# Altium PCB SBC_PCB.PcbDoc (part 3 of 4)
Units mm, origin at the board's own origin, x right, y up, seen from the top; angles counter-clockwise.
Board outline 85 x 56 mm, 8 copper layers (L1(SIG), L2(GND), L3(PWR), L4(SIG), L5(GND), L6(SIG), L7(GND), L8(SIG)), stack 1.593 mm thick; 597 components, 497 nets, 2394 pads, 229 vias.
Unrouted connection lines stored in the file: 1459.
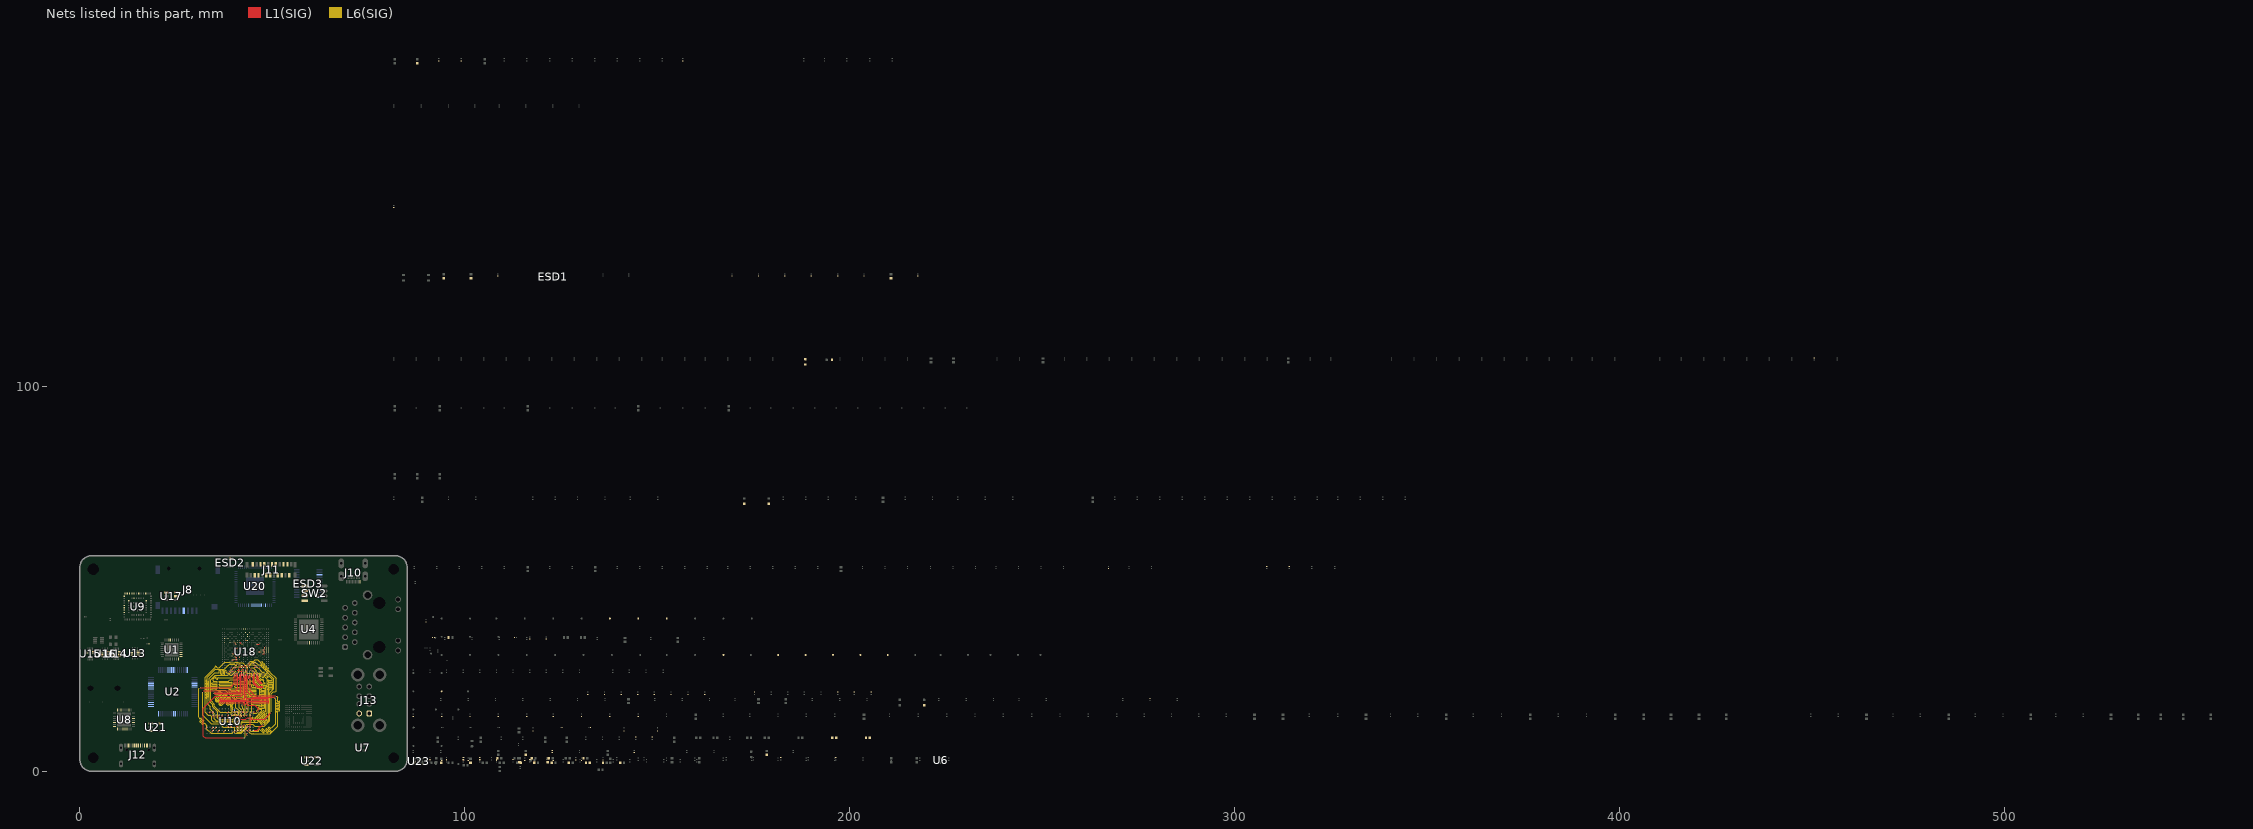
[diagram p4: the nets of this part, all layers, seen from the top]

## Via types
v1: diameter 0.35, hole 0.2, L1(SIG) to L8(SIG), 222 vias
v2: diameter 0.45, hole 0.2, L1(SIG) to L8(SIG), 7 vias

## Nets (pads, with @x,y where several pads share a name; then routed paths per layer and width w, separated by ;. In a path a pad name is that pad's centre, name@x,y a point inside that pad or via, vN(x,y) a via of type N, cw(c..) or ccw(c..) an arc to the next point about the centre after c; other vN are vias at no path point) (continued)
+3V3_PMIC: C72.1 C73.1 C75.1 C224.1 C225.1 C226.1 C227.1 C228.1 R72.2 R78.1 R79.1 R81.1 TP17.TP TP19.TP U8.6 U8.22 U18.F11 U18.G12 U18.H9 U18.K10 U18.Y13 | length 1.7
  L1(SIG) w0.076: v1(39.548,30.48) 39.558,30.49 39.99,30.49 U18.G12@40,30.5 ; U18.H9@40.5,29 40.533,28.967 40.858,28.967 v1(40.894,28.931) ; U18.K10@41.5,29.5 41.515,29.515 41.515,29.881 v1(41.529,29.896) ; U18.Y13@46.5,31 46.506,30.994 46.933,30.994 v1(46.939,30.988)
+3V3_uSD: C143.1 R129.1 R137.1 U17.1
+3V3_WB: C83.1 C84.1 C85.1 U9.3 U9.49
+5V_CONN: C258.1 J10.19
+5V_DVBUS1: C261.1 ESD5.1 J13.1 R182.1 U21.1
+5V_DVBUS2: C263.1 ESD8.1 J13.5 R189.1 U22.1
+5V_HDMI: C257.1 ESD3.15
+5V_SYS: C80.1 C267.1 R63.2 R65.2 R80.1 R183.1 R191.1 R213.1 TP13.TP U6.3 U7.3 U8.4 U8.5 U8.13 U8.26 U8.30 U21.5 U22.5 U23.5
+5V_VBUS: C259.1 C266.1 ESD4.1 J12.A4 J12.A9 J12.B4 J12.B9 R212.1 U18.H10 U23.3 | length 0.4
  L1(SIG) w0.076: U18.H10@40.5,29.5 40.533,29.533 40.729,29.533 40.812,29.616 v1(40.886,29.616)
+VDD_uSD: C141.1 C142.1 C144.1 C222.1 C223.1 ESD1.5 ESD2.5 J8.4 R74.2 R130.1 R131.1 R132.1 R133.1 R134.1 U17.5 U17.6 U18.J18
+VIO_HDMI: ESD3.24 R181.1
\DDR4_ACT: U10.L3 U18.N6 | length 33.9
  L1(SIG) w0.076: v1(42.951,27.051) 42.976,27.075 42.976,27.476 U18.N6@43,27.5
  L1(SIG) w0.12: v1(40.411,12.065) 40.411,12.027 41,11.438 U10.L3@41,11.4
  L6(SIG) w0.11: v1(40.411,12.065) 40.134,12.342 40.134,12.571 39.903,12.802 34.595,12.802 34.214,13.183 34.214,14.199 33.833,14.58 33.274,14.58 32.588,15.265 32.588,24.46 35.052,26.924 35.107,26.924 ccw(c35.107,27.034) 35.217,27.034 35.217,27.21 cw(c35.289,27.21) 35.289,27.282 35.505,27.282 cw(c35.505,27.21) 35.577,27.21 35.577,27.034 ccw(c35.687,27.034) 35.687,26.924 36.031,26.924 36.144,26.924 37.592,28.372 38.862,28.372 39.014,28.22 40.199,28.22 40.339,28.359 41.125,28.359 41.331,28.153 42.239,28.153 42.951,27.441 v1(42.951,27.051)
\DDR4_ALERT: R99.2 U10.P9 U18.R3 | length 0.6
  L1(SIG) w0.076: U10.P9@43.396,16.196 U10.P9@43.4,16.2 43.4,16.756 v1(43.404,16.76)
\DDR4_CAS: U10.M8 U18.M4 | length 33.9
  L1(SIG) w0.076: v1(42.13,26.622) 42.204,26.622 42.292,26.533 42.467,26.533 U18.M4@42.5,26.5
  L1(SIG) w0.12: U10.M8@41.8,15.4 41.808,15.4 42.156,15.748 v1(42.164,15.748)
  L6(SIG) w0.11: v1(42.13,26.622) 42.13,26.239 42.062,26.171 42.062,25.121 40.915,23.973 40.691,23.749 39.014,23.749 39.01,23.745 38.714,23.449 cw(c38.636,23.527) 38.636,23.417 36.246,23.417 ccw(c36.246,23.345) 36.174,23.345 36.174,23.129 ccw(c36.246,23.129) 36.246,23.057 39.491,23.057 cw(c39.491,22.985) 39.563,22.985 39.563,22.769 cw(c39.491,22.769) 39.491,22.697 36.246,22.697 ccw(c36.246,22.625) 36.174,22.625 36.174,22.409 ccw(c36.246,22.409) 36.246,22.337 39.491,22.337 cw(c39.491,22.265) 39.563,22.265 39.563,22.049 cw(c39.491,22.049) 39.491,21.977 36.246,21.977 ccw(c36.246,21.905) 36.174,21.905 36.174,21.689 ccw(c36.246,21.689) 36.246,21.617 38.632,21.617 cw(c38.632,21.494) 38.719,21.581 38.774,21.526 38.774,20.51 41.427,17.856 41.427,16.485 v1(42.164,15.748)
\DDR4_CS: U10.L7 U18.L6 | length 34.1
  L1(SIG) w0.076: v1(41.574,27.607) 41.648,27.607 41.755,27.5 U18.L6@42,27.5
  L1(SIG) w0.12: v1(40.284,13.462) 40.31,13.488 40.31,13.877 41,14.567 U10.L7@41,14.6
  L6(SIG) w0.11: v1(40.284,13.462) 39.954,13.132 35.408,13.132 34.95,13.589 34.95,14.961 33.858,16.053 33.858,16.713 33.045,17.526 33.045,18.772 33.045,18.827 ccw(c32.935,18.827) 32.935,18.937 32.92,18.937 cw(c32.92,19.009) 32.848,19.009 32.848,19.225 cw(c32.92,19.225) 32.92,19.297 33.221,19.297 ccw(c33.221,19.369) 33.293,19.369 33.293,19.585 ccw(c33.221,19.585) 33.221,19.657 32.92,19.657 cw(c32.92,19.729) 32.848,19.729 32.848,19.945 cw(c32.92,19.945) 32.92,20.017 33.221,20.017 ccw(c33.221,20.089) 33.293,20.089 33.293,20.305 ccw(c33.221,20.305) 33.221,20.377 32.92,20.377 cw(c32.92,20.449) 32.848,20.449 32.848,20.665 cw(c32.92,20.665) 32.92,20.737 33.221,20.737 ccw(c33.221,20.809) 33.293,20.809 33.293,21.025 ccw(c33.221,21.025) 33.221,21.097 32.92,21.097 cw(c32.92,21.169) 32.848,21.169 32.848,21.385 cw(c32.92,21.385) 32.92,21.457 33.221,21.457 ccw(c33.221,21.529) 33.293,21.529 33.293,21.745 ccw(c33.221,21.745) 33.221,21.817 32.92,21.817 cw(c32.92,21.889) 32.848,21.889 32.848,22.105 cw(c32.92,22.105) 32.92,22.177 33.221,22.177 ccw(c33.221,22.249) 33.293,22.249 33.293,22.465 ccw(c33.221,22.465) 33.221,22.537 32.92,22.537 cw(c32.92,22.609) 32.848,22.609 32.848,22.825 cw(c32.92,22.825) 32.92,22.897 33.221,22.897 ccw(c33.221,22.969) 33.293,22.969 33.293,23.185 ccw(c33.221,23.185) 33.221,23.257 32.92,23.257 cw(c32.92,23.329) 32.848,23.329 32.848,23.545 cw(c32.92,23.545) 32.92,23.617 32.935,23.617 ccw(c32.935,23.727) 33.045,23.727 33.045,23.901 33.045,24.359 35.204,26.518 37.506,26.518 38.573,27.585 38.643,27.585 38.846,27.787 40.142,27.787 40.23,27.699 40.641,27.699 40.806,27.864 41.317,27.864 v1(41.574,27.607)
\DDR4_LDM: U10.E7 U18.W5 | length 1.2
  L1(SIG) w0.076: v1(36.183,13.945) 36.191,13.953 36.191,14.591 U10.E7@36.2,14.6 ; U18.W5@46,27 46.026,27.026 v1(46.558,27.026)
\DDR4_RAS: U10.L8 U18.M5 | length 33.8
  L1(SIG) w0.076: v1(42.469,27.457) 42.484,27.442 42.484,27.016 U18.M5@42.5,27
  L1(SIG) w0.12: v1(40.716,15.037) 40.716,15.077 41,15.36 U10.L8@41,15.4
  L6(SIG) w0.11: v1(40.716,15.037) 40.716,14.402 39.802,13.487 36.068,13.487 35.789,13.767 35.789,15.494 34.525,16.758 34.525,17.253 33.553,18.224 33.553,24.155 35.001,25.603 36.079,25.603 36.134,25.603 ccw(c36.134,25.713) 36.244,25.713 36.244,26.186 cw(c36.316,26.186) 36.316,26.258 36.532,26.258 cw(c36.532,26.186) 36.604,26.186 36.604,25.3 ccw(c36.676,25.3) 36.676,25.228 36.892,25.228 ccw(c36.892,25.3) 36.964,25.3 36.964,26.186 cw(c37.036,26.186) 37.036,26.258 37.252,26.258 cw(c37.252,26.186) 37.324,26.186 37.324,25.3 ccw(c37.396,25.3) 37.396,25.228 37.612,25.228 ccw(c37.612,25.3) 37.684,25.3 37.684,26.141 cw(c37.756,26.141) 37.756,26.213 37.972,26.213 cw(c37.972,26.141) 38.044,26.141 38.044,25.713 ccw(c38.154,25.713) 38.154,25.603 38.983,25.603 39.116,25.603 39.37,25.857 39.37,26.266 40.282,27.178 41.801,27.178 42.081,27.457 v1(42.469,27.457)
\DDR4_RESET: R100.2 R103.1 U10.P1 U18.G1 | length 0.5
  L1(SIG) w0.076: U10.P1@43.4,9.8 43.404,9.796 43.404,9.301 v1(43.409,9.296)
\DDR4_UDM: U10.E2 U18.H5 | length 1.1
  L1(SIG) w0.076: v1(40.144,26.573) 40.144,26.608 40.467,26.931 40.467,26.967 U18.H5@40.5,27
  L1(SIG) w0.12: v1(35.815,10.213) v1(35.815,10.213) U10.E2@36.2,10.6 U10.E2@36.2,10.602
\DDR4_WE: U10.L2 U18.N3 | length 33.9
  L1(SIG) w0.076: U18.N3@43,26 43.005,26.005 43.48,26.005 v1(43.485,26.01)
  L1(SIG) w0.12: v1(40.665,10.236) 40.665,10.251 41,10.585 U10.L2@41,10.6
  L6(SIG) w0.11: v1(40.665,10.236) 40.697,10.236 40.85,10.084 41.834,10.084 43.078,11.328 43.078,11.913 43.358,12.192 44.882,12.192 45.365,11.709 47.93,11.709 49.378,13.157 49.378,20.422 50.368,21.412 50.368,24.054 46.752,27.67 46.653,27.67 46.644,27.661 46.371,27.661 46.361,27.67 46.279,27.67 45.603,28.346 44.753,28.346 44.136,27.729 43.476,27.729 43.283,27.536 43.283,26.906 43.485,26.704 v1(43.485,26.01)
\DFP_USB1_FLG: R183.2 U21.3
\DFP_USB2_FLG: R191.2 U22.3
\EMMC_RESET: D3.1
\ETH_PHY_RST: D2.1
\HDMI_INT: R166.2 TP51.TP U20.52
\HDMI_RST: D7.1
\PMIC_INT: R78.2 U8.11
\PMIC_RSTOUT: R79.2 U8.18
\RESET: D3.2 D4.2 R117.2 TP6.TP U11.K5
\RESET: D1.2 D2.2 R26.2 U4.43
\RESETSTATz: D4.1
ADCOUT: R3.2 U1.9
AUXOUT1: C1.1 U1.21
AUXOUT1_CON: C1.2 R10.2
AUXOUT2: C2.1 U1.22
AUXOUT2_CON: C2.2 R9.2
BCLK: R1.2 U1.8
BOOTMODE00: R201.2 R211.1 U18.M25
BOOTMODE01: R202.2 R210.1 U18.N23
BOOTMODE02: R203.2 R209.1 U18.N24
BOOTMODE03: R208.1 SW2.4 U18.N25
BOOTMODE04: R207.1 SW2.3 U18.P24
BOOTMODE05: R206.1 SW2.2 U18.P22
BOOTMODE06: R205.1 SW2.1 U18.P21
BOOTMODE07: R196.2 R204.1 U18.R23
BT_DEV_WAKE: U9.51
BT_GPIO_2: TP34.TP U9.18
BT_GPIO_3: TP35.TP U9.19
BT_GPIO_5: TP36.TP U9.20
BT_HOST_WAKE: U9.17
BT_PCM_CLK: R89.1 U18.B20
BT_PCM_IN: U9.6 U18.E18
BT_PCM_OUT: U9.9 U18.B18
BT_PCM_SYNC: U9.8 U18.D20
BT_REG_EN: U9.68
BT_UART_CTS_N: U9.11
BT_UART_RTS_N: U9.13
BT_UART_RXD: U9.12
BT_UART_TXD: U9.10
BUCK1_VOUT: C67.1 R71.1 TP14.TP U8.1
BUCK2_VOUT: C69.1 R72.1 TP15.TP U8.32
BUCK3_VOUT: C71.1 R73.1 TP16.TP U8.24
CAM_I2C_SCL: J11.20
CAM_I2C_SDA: J11.21
CAM_IO0: J11.17
CAM_IO1: J11.18
CAP_VDDS0: C229.1 U18.H15 | length 0.5
  L1(SIG) w0.076: U18.H15@40.5,32 40.515,32.015 40.93,32.015 v1(40.945,32.029)
CAP_VDDS1: C230.1 U18.K18 | length 0.7
  L1(SIG) w0.076: U18.K18@41.5,33.5 41.547,33.5 41.995,33.052 v1(42.044,33.052)
CAP_VDDS2: C231.1 U18.W17 | length 0.7
  L1(SIG) w0.076: U18.W17@46,33 46.033,33.033 46.632,33.033 v1(46.691,33.093)
CAP_VDDS3: C232.1 U18.P19 | length 0.4
  L1(SIG) w0.076: v1(43.104,34.061) 43.135,34.031 43.469,34.031 U18.P19@43.5,34
CAP_VDDS4: C233.1 U18.U7 | length 0.5
  L1(SIG) w0.076: U18.U7@45,28 45.008,28.008 45.458,28.008 v1(45.466,28.016)
CAP_VDDS5: C234.1 U18.H17 | length 0.7
  L1(SIG) w0.076: v1(40.03,33.477) 40.03,33.473 40.5,33.004 U18.H17@40.5,33
CAP_VDDS6: C235.1 U18.J19
CAP_VDDS_CANUART: C236.1 U18.G9 | length 0.5
  L1(SIG) w0.076: v1(39.55,28.897) 39.624,28.897 39.727,29 U18.G9@40,29
CAP_VDDS_MCU: C237.1 U18.H11 | length 0.4
  L1(SIG) w0.076: v1(40.097,30.011) 40.103,30.005 40.495,30.005 U18.H11@40.5,30
CLK_OUT0: 
CLK_OUT1: 
CLK_OUT2: 
CLK_OUT3: 
CODEC_CLK: U1.11
CSI0_RXRCALIB: R146.1 U18.AA14
CSI_CLK_N: J11.8 U18.AD15
CSI_CLK_P: J11.9 U18.AE15
CSI_D0_N: J11.2 U18.AB14 | length 0.5
  L1(SIG) w0.076: U18.AB14@47.5,31.5 47.511,31.511 47.995,31.511 v1(48.006,31.521)
CSI_D0_P: J11.3 U18.AC15 | length 0.4
  L1(SIG) w0.076: U18.AC15@48,32 48.003,32.003 48.003,32.407 v1(48.006,32.41)
CSI_D1_N: J11.5 U18.AD14
CSI_D1_P: J11.6 U18.AE14
CSI_D2_N: J11.11 U18.AD13
CSI_D2_P: J11.12 U18.AE13
CSI_D3_N: J11.14 U18.AB12 | length 0.5
  L1(SIG) w0.076: U18.AB12@47.5,30.5 47.503,30.503 48.003,30.503 v1(48.006,30.505)
CSI_D3_P: J11.15 U18.AC13 | length 0.4
  L1(SIG) w0.076: v1(47.589,31.016) 47.597,31.008 47.992,31.008 U18.AC13@48,31
D16: R169.2 U20.13
D17: R170.2 U20.11
D18: R171.2 U20.10
D19: R172.2 U20.9
D20: R173.2 U20.8
D21: R174.2 U20.7
D22: R175.2 U20.6
D23: R176.2 U20.4
DACIN: R4.2 U1.10
DBG_JTAG_TCK: U13.12
DBG_JTAG_TDI: U13.11
DBG_JTAG_TDO: U13.10
DBG_JTAG_TMS: U13.9
DBG_UART1_CTS: U14.9
DBG_UART1_RTS: U14.10
DBG_UART1_RXD: U14.11
DBG_UART1_TXD: U14.12
DBG_UART2_CTS: U15.9
DBG_UART2_RTS: U15.10
DBG_UART2_RXD: U15.11
DBG_UART2_TXD: U15.12
DBG_UART3_CTS: U16.9
DBG_UART3_RTS: U16.10
DBG_UART3_RXD: U16.11
DBG_UART3_TXD: U16.12
DBG_USB_CC1: J12.A5 R188.1
DBG_USB_CC2: J12.B5 R187.1
DBG_USB_N: ESD6.2 J12.A7 J12.B7 U2.7
DBG_USB_P: ESD7.2 J12.A6 J12.B6 U2.8
DBGT_JTAG_TCK: U2.16
DBGT_JTAG_TDI: U2.17 U13.2
DBGT_JTAG_TDO: U2.18 U13.3
DBGT_JTAG_TMS: U2.19 U13.4
DBGT_UART1_CTS: U2.29 U14.4
DBGT_UART1_RTS: U2.28 U14.3
DBGT_UART1_RXD: U2.27 U14.2
DBGT_UART1_TXD: U2.26
DBGT_UART2_CTS: U2.41 U15.4
DBGT_UART2_RTS: U2.40 U15.3
DBGT_UART2_RXD: U2.39 U15.2
DBGT_UART2_TXD: U2.38
DBGT_UART3_CTS: U2.54 U16.4
DBGT_UART3_RTS: U2.53 U16.3
DBGT_UART3_RXD: U2.52 U16.2
DBGT_UART3_TXD: U2.48
DDR4_A0: U10.P3 U18.J1 | length 35.2
  L1(SIG) w0.076: 41,24.359 U18.J1@41,25
  L1(SIG) w0.12: v1(31.902,20.676) 32.156,20.93 40.386,20.93 41,21.544 41,24.359 ; U10.P3@43.4,11.4 43.4,11.449 43.764,11.813 v1(43.764,11.862)
  L6(SIG) w0.11: v1(31.902,20.676) 31.902,14.554 34.163,12.294 36.347,12.294 37.186,11.455 39.15,11.455 39.175,11.481 40.132,11.481 40.284,11.328 40.284,10.015 40.476,9.824 41.941,9.824 43.338,11.221 43.338,11.436 v1(43.764,11.862)
DDR4_A1: U10.P7 U18.J2 | length 34.4
  L1(SIG) w0.076: 40.636,24.359 40.636,24.753 40.749,24.866 40.749,25.249 U18.J2@41,25.5
  L1(SIG) w0.12: v1(40.615,22.174) 40.636,22.196 40.636,24.359 ; v1(43.015,14.213) v1(43.015,14.213) U10.P7@43.4,14.6 U10.P7@43.4,14.6
  L6(SIG) w0.11: v1(40.615,22.174) 40.335,22.174 40.243,22.082 40.243,21.987 40.243,21.932 ccw(c40.353,21.932) 40.353,21.822 42.111,21.822 cw(c42.111,21.75) 42.183,21.75 42.183,21.534 cw(c42.111,21.534) 42.111,21.462 39.106,21.462 ccw(c39.106,21.39) 39.034,21.39 39.034,21.174 ccw(c39.106,21.174) 39.106,21.102 42.111,21.102 cw(c42.111,21.03) 42.183,21.03 42.183,20.814 cw(c42.111,20.814) 42.111,20.742 39.341,20.742 ccw(c39.341,20.67) 39.269,20.67 39.269,20.454 ccw(c39.341,20.454) 39.341,20.382 42.111,20.382 cw(c42.111,20.31) 42.183,20.31 42.183,20.094 cw(c42.111,20.094) 42.111,20.022 40.061,20.022 ccw(c40.061,19.95) 39.989,19.95 39.989,19.734 ccw(c40.061,19.734) 40.061,19.662 42.111,19.662 cw(c42.111,19.59) 42.183,19.59 42.183,19.374 cw(c42.111,19.374) 42.111,19.302 40.781,19.302 ccw(c40.781,19.23) 40.709,19.23 40.709,19.014 ccw(c40.781,19.014) 40.781,18.942 42.111,18.942 cw(c42.111,18.87) 42.183,18.87 42.183,18.654 cw(c42.111,18.654) 42.111,18.582 41.826,18.582 ccw(c41.826,18.51) 41.754,18.51 41.754,18.294 ccw(c41.826,18.294) 41.826,18.222 42.082,18.222 cw(c42.082,18.112) 42.16,18.19 42.748,17.602 42.934,17.417 42.934,15.365 42.774,15.205 42.774,14.833 43.015,14.593 v1(43.015,14.213)
DDR4_A2: U10.R3 U18.K3 | length 34.4
  L1(SIG) w0.076: U18.K3@41.5,26 41.505,26.005 42.362,26.005 v1(42.393,26.035)
  L1(SIG) w0.12: v1(43.942,13.614) 44.2,13.356 U10.R3@44.2,11.4
  L6(SIG) w0.11: v1(42.393,26.035) 42.697,25.73 42.697,24.359 42.697,24.282 ; 42.698,24.282 ccw(c42.776,24.359) 42.854,24.282 42.88,24.308 cw(c42.931,24.257) 42.982,24.308 43.134,24.155 cw(c43.083,24.104) 43.134,24.053 42.857,23.776 ccw(c42.908,23.725) 42.857,23.674 43.01,23.521 ccw(c43.061,23.572) 43.112,23.521 43.366,23.776 cw(c43.417,23.725) 43.468,23.776 43.621,23.623 cw(c43.57,23.572) 43.621,23.521 43.274,23.174 ccw(c43.324,23.123) 43.274,23.072 43.426,22.919 ccw(c43.477,22.97) 43.528,22.919 44.174,23.565 cw(c44.225,23.514) 44.276,23.565 44.428,23.412 cw(c44.377,23.361) 44.428,23.311 43.869,22.751 ccw(c43.92,22.7) 43.869,22.649 44.022,22.497 ccw(c44.073,22.548) 44.124,22.497 44.226,22.599 cw(c44.303,22.521) 44.381,22.599 44.538,22.442 44.577,22.403 44.577,22.123 44.577,21.935 ccw(c44.687,21.935) 44.687,21.825 45.741,21.825 cw(c45.741,21.753) 45.813,21.753 45.813,21.537 cw(c45.741,21.537) 45.741,21.465 44.095,21.465 ccw(c44.095,21.393) 44.023,21.393 44.023,21.177 ccw(c44.095,21.177) 44.095,21.105 45.751,21.105 cw(c45.751,21.033) 45.823,21.033 45.823,20.817 cw(c45.751,20.817) 45.751,20.745 44.095,20.745 ccw(c44.095,20.673) 44.023,20.673 44.023,20.457 ccw(c44.095,20.457) 44.095,20.385 45.751,20.385 cw(c45.751,20.313) 45.823,20.313 45.823,20.097 cw(c45.751,20.097) 45.751,20.025 44.095,20.025 ccw(c44.095,19.953) 44.023,19.953 44.023,19.737 ccw(c44.095,19.737) 44.095,19.665 45.751,19.665 cw(c45.751,19.593) 45.823,19.593 45.823,19.377 cw(c45.751,19.377) 45.751,19.305 44.095,19.305 ccw(c44.095,19.233) 44.023,19.233 44.023,19.017 ccw(c44.095,19.017) 44.095,18.945 44.467,18.945 cw(c44.467,18.835) 44.577,18.835 44.577,18.78 44.577,15.545 44.257,15.225 44.257,13.929 v1(43.942,13.614)
DDR4_A3: U10.N7 U18.L5 | length 34
  L1(SIG) w0.076: v1(41.199,26.848) 41.273,26.848 41.425,27 U18.L5@42,27
  L1(SIG) w0.12: v1(42.215,14.213) v1(42.215,14.213) U10.N7@42.6,14.6 U10.N7@42.6,14.6
  L6(SIG) w0.11: v1(41.199,26.848) 41.199,25.705 39.776,24.282 36.703,24.282 35.945,24.282 ccw(c35.945,24.172) 35.835,24.172 35.835,24.034 cw(c35.763,24.034) 35.763,23.962 35.547,23.962 cw(c35.547,24.034) 35.475,24.034 35.475,24.49 ccw(c35.403,24.49) 35.403,24.562 35.187,24.562 ccw(c35.187,24.49) 35.115,24.49 35.115,24.392 cw(c35.005,24.392) 35.005,24.282 34.95,24.282 34.696,24.028 34.696,23.749 34.696,23.462 ccw(c34.806,23.462) 34.806,23.352 35.656,23.352 cw(c35.656,23.28) 35.728,23.28 35.728,23.064 cw(c35.656,23.064) 35.656,22.992 34.292,22.992 ccw(c34.292,22.92) 34.22,22.92 34.22,22.704 ccw(c34.292,22.704) 34.292,22.632 35.656,22.632 cw(c35.656,22.56) 35.728,22.56 35.728,22.344 cw(c35.656,22.344) 35.656,22.272 34.292,22.272 ccw(c34.292,22.2) 34.22,22.2 34.22,21.984 ccw(c34.292,21.984) 34.292,21.912 35.656,21.912 cw(c35.656,21.84) 35.728,21.84 35.728,21.624 cw(c35.656,21.624) 35.656,21.552 34.292,21.552 ccw(c34.292,21.48) 34.22,21.48 34.22,21.264 ccw(c34.292,21.264) 34.292,21.192 35.348,21.192 cw(c35.348,21.069) 35.435,21.156 35.49,21.101 35.509,21.082 37.77,21.082 40.528,18.324 40.528,18.021 40.528,16.525 41.101,15.951 41.123,15.951 41.656,15.418 41.656,14.772 v1(42.215,14.213)
DDR4_A4: U10.N3 U18.K4 | length 33.8
  L1(SIG) w0.076: v1(40.688,26.25) 41.25,26.25 U18.K4@41.5,26.5
  L1(SIG) w0.12: U10.N3@42.6,11.4 42.623,11.423 42.623,12.067 v1(42.647,12.09)
  L6(SIG) w0.11: v1(40.688,26.25) 40.688,26.226 39.937,25.475 39.43,24.968 38.997,24.968 cw(c38.997,25.078) 38.887,25.078 38.887,25.271 ccw(c38.815,25.271) 38.815,25.343 38.599,25.343 ccw(c38.599,25.271) 38.527,25.271 38.527,25.078 cw(c38.417,25.078) 38.417,24.968 38.362,24.968 35.154,24.968 33.96,23.774 33.96,18.415 34.95,17.424 34.95,16.891 36.474,15.367 39.167,15.367 39.37,15.164 39.37,14.732 39.599,14.503 40.245,14.503 40.31,14.568 40.31,15.392 40.564,15.646 40.945,15.646 41.224,15.367 41.224,14.554 41.642,14.136 41.642,13.601 40.894,12.852 40.894,10.897 41.3,10.49 41.707,10.49 42.215,10.998 42.215,11.636 42.647,12.068 v1(42.647,12.09)
DDR4_A5: U10.P8 U18.K1 | length 34.3
  L1(SIG) w0.076: 41.45,24.359 41.5,24.409 U18.K1@41.5,25
  L1(SIG) w0.12: v1(41.335,23.571) 41.335,24.244 41.45,24.359 ; v1(43.104,15.011) 43.104,15.058 43.4,15.354 U10.P8@43.4,15.4
  L6(SIG) w0.11: v1(41.335,23.571) 41.487,23.42 41.542,23.365 ; 41.543,23.364 ccw(c41.629,23.451) 41.629,23.329 42.805,23.329 cw(c42.805,23.257) 42.877,23.257 42.877,23.041 cw(c42.805,23.041) 42.805,22.969 39.975,22.969 ccw(c39.975,22.897) 39.903,22.897 39.903,22.681 ccw(c39.975,22.681) 39.975,22.609 43.525,22.609 cw(c43.525,22.537) 43.597,22.537 43.597,22.321 cw(c43.525,22.321) 43.525,22.249 42.485,22.249 ccw(c42.485,22.177) 42.413,22.177 42.413,21.961 ccw(c42.485,21.961) 42.485,21.889 43.691,21.889 cw(c43.691,21.817) 43.763,21.817 43.763,21.601 cw(c43.691,21.601) 43.691,21.529 42.515,21.529 ccw(c42.515,21.457) 42.443,21.457 42.443,21.241 ccw(c42.515,21.241) 42.515,21.169 43.691,21.169 cw(c43.691,21.097) 43.763,21.097 43.763,20.881 cw(c43.691,20.881) 43.691,20.809 42.515,20.809 ccw(c42.515,20.737) 42.443,20.737 42.443,20.521 ccw(c42.515,20.521) 42.515,20.449 43.691,20.449 cw(c43.691,20.377) 43.763,20.377 43.763,20.161 cw(c43.691,20.161) 43.691,20.089 42.515,20.089 ccw(c42.515,20.017) 42.443,20.017 42.443,19.801 ccw(c42.515,19.801) 42.515,19.729 43.691,19.729 cw(c43.691,19.657) 43.763,19.657 43.763,19.441 cw(c43.691,19.441) 43.691,19.369 42.515,19.369 ccw(c42.515,19.297) 42.443,19.297 42.443,19.081 ccw(c42.515,19.081) 42.515,19.009 43.691,19.009 cw(c43.691,18.937) 43.763,18.937 43.763,18.721 cw(c43.691,18.721) 43.691,18.649 42.515,18.649 ccw(c42.515,18.577) 42.443,18.577 42.443,18.361 ccw(c42.515,18.361) 42.515,18.289 43.601,18.289 cw(c43.601,18.217) 43.673,18.217 43.673,18.001 cw(c43.601,18.001) 43.601,17.929 43.322,17.929 ccw(c43.322,17.819) 43.245,17.741 43.739,17.247 43.739,16.51 43.739,15.596 43.155,15.011 v1(43.104,15.011)
DDR4_A6: U10.P2 U18.R2 | length 35.2
  L1(SIG) w0.076: U18.R2@44,25.5 44.249,25.251 44.249,24.359
  L1(SIG) w0.12: U10.P2@43.4,10.6 43.426,10.6 43.789,10.236 v1(43.815,10.236) ; 44.249,24.359 44.249,20.877 45.466,19.66 51.029,19.66 v1(51.054,19.634)
  L6(SIG) w0.11: v1(43.815,10.236) 43.861,10.19 43.969,10.19 44.482,9.677 49.479,9.677 51.435,11.633 51.435,15.162 51.435,15.217 ccw(c51.325,15.217) 51.325,15.327 51.183,15.327 cw(c51.183,15.399) 51.111,15.399 51.111,15.615 cw(c51.183,15.615) 51.183,15.687 51.79,15.687 ccw(c51.79,15.759) 51.862,15.759 51.862,15.975 ccw(c51.79,15.975) 51.79,16.047 51.183,16.047 cw(c51.183,16.119) 51.111,16.119 51.111,16.335 cw(c51.183,16.335) 51.183,16.407 51.79,16.407 ccw(c51.79,16.479) 51.862,16.479 51.862,16.695 ccw(c51.79,16.695) 51.79,16.767 51.183,16.767 cw(c51.183,16.839) 51.111,16.839 51.111,17.055 cw(c51.183,17.055) 51.183,17.127 51.79,17.127 ccw(c51.79,17.199) 51.862,17.199 51.862,17.415 ccw(c51.79,17.415) 51.79,17.487 51.183,17.487 cw(c51.183,17.559) 51.111,17.559 51.111,17.775 cw(c51.183,17.775) 51.183,17.847 51.79,17.847 ccw(c51.79,17.919) 51.862,17.919 51.862,18.135 ccw(c51.79,18.135) 51.79,18.207 51.299,18.207 cw(c51.299,18.279) 51.227,18.279 51.227,18.495 cw(c51.299,18.495) 51.299,18.567 51.325,18.567 ccw(c51.325,18.677) 51.435,18.677 51.435,18.923 51.435,19.253 v1(51.054,19.634)
DDR4_A7: U10.R8 U18.P2 | length 37.6
  L1(SIG) w0.076: 43.23,24.359 43.249,24.378 43.249,25.249 U18.P2@43.5,25.5
  L1(SIG) w0.12: 43.23,24.359 43.23,19.507 43.23,19.03 ccw(c43.35,19.03) 43.35,18.91 48.87,18.91 cw(c48.87,18.836) 48.944,18.836 48.944,18.614 cw(c48.87,18.614) 48.87,18.54 43.304,18.54 ccw(c43.304,18.466) 43.23,18.466 43.23,18.244 ccw(c43.304,18.244) 43.304,18.17 48.942,18.17 cw(c48.942,18.096) 49.016,18.096 49.016,17.874 cw(c48.942,17.874) 48.942,17.8 43.35,17.8 ccw(c43.35,17.68) 43.23,17.68 43.23,17.578 43.475,17.333 43.663,17.145 45.39,17.145 46.304,16.231 v1(46.304,15.443) ; U10.R8@44.2,15.4 44.245,15.4 44.608,15.037 v1(44.653,15.037)
  L6(SIG) w0.11: v1(44.653,15.037) 45.898,15.037 v1(46.304,15.443)
DDR4_A8: U10.R2 U18.P1 | length 35.1
  L1(SIG) w0.076: 43.5,24.359 U18.P1@43.5,25
  L1(SIG) w0.12: 43.5,24.359 43.5,20.711 44.933,19.279 50.394,19.279 v1(50.673,18.999) ; v1(43.811,10.985) v1(43.811,10.985) 44.198,10.6 U10.R2@44.2,10.6
  L6(SIG) w0.11: v1(43.811,10.985) 44.357,10.439 46.239,10.439 46.362,10.439 ccw(c46.362,10.549) 46.44,10.627 46.253,10.814 cw(c46.304,10.865) 46.253,10.916 46.406,11.068 cw(c46.457,11.017) 46.508,11.068 47.588,9.988 ccw(c47.639,10.039) 47.69,9.988 47.843,10.141 ccw(c47.792,10.192) 47.843,10.243 47.272,10.814 cw(c47.323,10.865) 47.272,10.916 47.424,11.068 cw(c47.475,11.017) 47.526,11.068 48.606,9.988 ccw(c48.657,10.039) 48.708,9.988 48.861,10.141 ccw(c48.81,10.192) 48.861,10.243 48.29,10.814 cw(c48.341,10.865) 48.29,10.916 48.443,11.068 cw(c48.494,11.017) 48.544,11.068 49.473,10.14 ccw(c49.523,10.191) 49.574,10.14 49.727,10.293 ccw(c49.676,10.344) 49.727,10.395 48.96,11.162 cw(c49.011,11.212) 48.96,11.263 49.113,11.416 cw(c49.164,11.365) 49.215,11.416 49.478,11.153 ccw(c49.556,11.231) 49.634,11.153 50.038,11.557 50.851,12.37 50.851,18.815 50.673,18.993 v1(50.673,18.999)
DDR4_A9: U10.R7 U18.P4 | length 34.1
  L1(SIG) w0.076: v1(43.104,26.467) 43.12,26.483 43.483,26.483 U18.P4@43.5,26.5
  L1(SIG) w0.12: U10.R7@44.198,14.6 U10.R7@44.2,14.6 44.585,14.215 v1(44.587,14.215)
  L6(SIG) w0.11: v1(43.104,26.467) 43.104,25.724 43.326,25.502 44.425,25.502 44.463,25.463 44.584,25.342 cw(c44.506,25.264) 44.584,25.187 44.579,25.182 ccw(c44.63,25.131) 44.579,25.08 44.732,24.927 ccw(c44.783,24.978) 44.834,24.927 45.177,25.27 cw(c45.228,25.219) 45.279,25.27 45.432,25.118 cw(c45.381,25.067) 45.432,25.016 45.088,24.672 ccw(c45.139,24.622) 45.088,24.571 45.241,24.418 ccw(c45.292,24.469) 45.343,24.418 45.348,24.423 cw(c45.426,24.345) 45.503,24.423 45.542,24.384 45.593,24.333 45.632,24.294 45.79,24.136 ccw(c45.868,24.214) 45.946,24.136 46.117,24.308 cw(c46.168,24.257) 46.219,24.308 46.372,24.155 cw(c46.321,24.104) 46.372,24.053 46.073,23.755 ccw(c46.124,23.704) 46.073,23.653 46.226,23.5 ccw(c46.277,23.551) 46.328,23.5 46.637,23.81 cw(c46.688,23.759) 46.739,23.81 46.892,23.657 cw(c46.841,23.606) 46.892,23.555 46.709,23.373 ccw(c46.787,23.295) 46.709,23.217 46.964,22.962 47.003,22.924 47.269,22.657 47.269,22.2 47.269,21.575 cw(c47.159,21.575) 47.159,21.465 47.017,21.465 ccw(c47.017,21.393) 46.945,21.393 46.945,21.177 ccw(c47.017,21.177) 47.017,21.105 47.928,21.105 cw(c47.928,21.033) 48,21.033 48,20.817 cw(c47.928,20.817) 47.928,20.745 47.017,20.745 ccw(c47.017,20.673) 46.945,20.673 46.945,20.457 ccw(c47.017,20.457) 47.017,20.385 47.928,20.385 cw(c47.928,20.313) 48,20.313 48,20.097 cw(c47.928,20.097) 47.928,20.025 47.017,20.025 ccw(c47.017,19.953) 46.945,19.953 46.945,19.737 ccw(c47.017,19.737) 47.017,19.665 47.928,19.665 cw(c47.928,19.593) 48,19.593 48,19.377 cw(c47.928,19.377) 47.928,19.305 47.214,19.305 ccw(c47.214,19.233) 47.142,19.233 47.142,19.017 ccw(c47.214,19.017) 47.214,18.945 47.928,18.945 cw(c47.928,18.873) 48,18.873 48,18.657 cw(c47.928,18.657) 47.928,18.585 47.214,18.585 ccw(c47.214,18.513) 47.142,18.513 47.142,18.297 ccw(c47.214,18.297) 47.214,18.225 47.928,18.225 cw(c47.928,18.153) 48,18.153 48,17.937 cw(c47.928,17.937) 47.928,17.865 47.214,17.865 ccw(c47.214,17.793) 47.142,17.793 47.142,17.577 ccw(c47.214,17.577) 47.214,17.505 47.928,17.505 cw(c47.928,17.433) 48,17.433 48,17.217 cw(c47.928,17.217) 47.928,17.145 47.214,17.145 ccw(c47.214,17.073) 47.142,17.073 47.142,16.857 ccw(c47.214,16.857) 47.214,16.785 47.928,16.785 cw(c47.928,16.713) 48,16.713 48,16.497 cw(c47.928,16.497) 47.928,16.425 46.738,16.425 ccw(c46.738,16.353) 46.666,16.353 46.666,16.137 ccw(c46.738,16.137) 46.738,16.065 47.159,16.065 cw(c47.159,15.955) 47.269,15.955 47.269,15.9 47.269,15.672 45.517,13.919 44.882,13.919 v1(44.587,14.215)
DDR4_A10: U10.M3 U18.R5 | length 34
  L1(SIG) w0.076: U18.R5@44,27 44.003,27.003 44.203,27.003 44.307,26.899 v1(44.374,26.899)
  L1(SIG) w0.12: U10.M3@41.8,11.4 41.842,11.442 41.842,11.82 v1(41.885,11.862)
  L6(SIG) w0.11: v1(41.885,11.862) 41.885,12.259 42.332,12.706 45.777,12.706 46.228,12.706 46.374,12.852 cw(c46.451,12.774) 46.529,12.852 47.135,12.245 ccw(c47.186,12.296) 47.237,12.245 47.39,12.398 ccw(c47.339,12.449) 47.39,12.5 46.756,13.134 cw(c46.807,13.185) 46.756,13.236 46.908,13.389 cw(c46.959,13.338) 47.01,13.389 47.821,12.578 ccw(c47.872,12.629) 47.923,12.578 48.075,12.731 ccw(c48.025,12.782) 48.075,12.833 47.265,13.643 cw(c47.316,13.694) 47.265,13.745 47.417,13.898 cw(c47.468,13.847) 47.519,13.898 48.33,13.087 ccw(c48.381,13.138) 48.432,13.087 48.585,13.24 ccw(c48.534,13.291) 48.585,13.342 47.774,14.153 cw(c47.824,14.204) 47.774,14.254 47.926,14.407 cw(c47.977,14.356) 48.028,14.407 48.422,14.013 ccw(c48.473,14.064) 48.524,14.013 48.677,14.166 ccw(c48.626,14.217) 48.677,14.268 48.311,14.633 cw(c48.389,14.711) 48.311,14.789 48.692,15.17 48.692,23.851 48.01,24.532 47.923,24.619 ccw(c47.845,24.541) 47.735,24.541 47.735,24.431 cw(c47.663,24.431) 47.663,24.359 47.447,24.359 cw(c47.447,24.431) 47.375,24.431 47.375,25.277 ccw(c47.303,25.277) 47.303,25.349 47.087,25.349 ccw(c47.087,25.277) 47.015,25.277 47.015,24.726 cw(c46.943,24.726) 46.943,24.654 46.727,24.654 cw(c46.727,24.726) 46.655,24.726 46.655,25.366 ccw(c46.545,25.366) 46.545,25.476 46.108,25.476 45.747,25.838 45.747,26.137 45.544,26.34 44.985,26.899 v1(44.374,26.899)
DDR4_A11: U10.T2 U18.P5 | length 34.4
  L1(SIG) w0.076: U18.P5@43.5,27 43.527,27.027 43.527,27.239 43.613,27.325 v1(43.613,27.399)
  L1(SIG) w0.12: U10.T2@45,10.6 46.058,10.6 46.557,11.099 46.599,11.141 ccw(c46.515,11.226) 46.599,11.311 46.5,11.41 cw(c46.552,11.462) 46.5,11.515 46.657,11.672 cw(c46.709,11.619) 46.762,11.672 46.861,11.572 ccw(c46.946,11.657) 47.031,11.572 47.244,11.786 v1(47.6,12.141)
  L6(SIG) w0.11: v1(43.613,27.399) 44.173,27.399 44.491,27.717 45.299,27.717 46.188,26.828 46.264,26.828 47.269,25.823 47.412,25.679 47.794,25.679 cw(c47.794,25.569) 47.904,25.569 47.904,24.981 ccw(c47.976,24.981) 47.976,24.909 48.192,24.909 ccw(c48.192,24.981) 48.264,24.981 48.264,25.359 cw(c48.336,25.359) 48.336,25.431 48.552,25.431 cw(c48.552,25.359) 48.624,25.359 48.624,24.431 ccw(c48.696,24.431) 48.696,24.359 48.912,24.359 ccw(c48.912,24.431) 48.984,24.431 48.984,24.614 cw(c49.094,24.614) 49.171,24.692 49.299,24.564 49.826,24.037 49.936,23.927 49.936,23.761 cw(c49.826,23.761) 49.826,23.651 49.024,23.651 ccw(c49.024,23.579) 48.952,23.579 48.952,23.363 ccw(c49.024,23.363) 49.024,23.291 50.036,23.291 cw(c50.036,23.219) 50.108,23.219 50.108,23.003 cw(c50.036,23.003) 50.036,22.931 49.024,22.931 ccw(c49.024,22.859) 48.952,22.859 48.952,22.643 ccw(c49.024,22.643) 49.024,22.571 50.036,22.571 cw(c50.036,22.499) 50.108,22.499 50.108,22.283 cw(c50.036,22.283) 50.036,22.211 49.024,22.211 ccw(c49.024,22.139) 48.952,22.139 48.952,21.923 ccw(c49.024,21.923) 49.024,21.851 50.007,21.851 cw(c50.007,21.779) 50.079,21.779 50.079,21.563 cw(c50.007,21.563) 50.007,21.491 49.024,21.491 ccw(c49.024,21.419) 48.952,21.419 48.952,21.203 ccw(c49.024,21.203) 49.024,21.131 49.059,21.131 cw(c49.059,21.021) 49.137,20.943 49.05,20.856 48.997,20.803 48.997,13.284 47.857,12.145 47.603,12.145 v1(47.6,12.141)
DDR4_A12: U10.M7 U18.R6 | length 35
  L1(SIG) w0.076: v1(43.888,28.098) 43.888,28.024 44,27.912 U18.R6@44,27.5
  L1(SIG) w0.12: U10.M7@41.8,14.6 41.402,14.202 41.402,13.843 41.732,13.513 43.099,13.513 43.536,13.949 44.191,13.949 44.577,13.564 48.006,13.564 v1(49.708,15.265)
  L6(SIG) w0.11: v1(43.888,28.098) 44.396,28.606 45.192,28.606 45.517,28.931 46.203,28.931 46.838,28.296 46.876,28.257 ccw(c46.954,28.334) 47.032,28.257 47.214,28.439 cw(c47.265,28.388) 47.316,28.439 47.469,28.286 cw(c47.418,28.235) 47.469,28.184 47.088,27.804 ccw(c47.139,27.753) 47.088,27.702 47.241,27.549 ccw(c47.292,27.6) 47.343,27.549 47.723,27.93 cw(c47.774,27.879) 47.825,27.93 47.978,27.777 cw(c47.927,27.726) 47.978,27.675 47.597,27.294 ccw(c47.648,27.243) 47.597,27.193 47.75,27.04 ccw(c47.801,27.091) 47.852,27.04 48.233,27.421 cw(c48.283,27.37) 48.334,27.421 48.487,27.268 cw(c48.436,27.217) 48.487,27.166 48.106,26.785 ccw(c48.157,26.734) 48.106,26.683 48.259,26.531 ccw(c48.31,26.582) 48.361,26.531 48.742,26.912 cw(c48.793,26.861) 48.843,26.912 48.996,26.759 cw(c48.945,26.708) 48.996,26.657 48.643,26.304 ccw(c48.694,26.253) 48.643,26.202 48.796,26.049 ccw(c48.847,26.1) 48.897,26.049 48.913,26.065 cw(c48.991,25.987) 49.069,26.065 49.337,25.796 49.376,25.757 50.952,24.181 50.952,20.777 50.8,20.625 50.206,20.625 49.86,20.279 49.86,20.276 49.708,20.124 v1(49.708,15.265)
DDR4_A13: U10.T8 U18.R1 | length 34.1
  L1(SIG) w0.076: 43.96,24.359 44,24.399 U18.R1@44,25
  L1(SIG) w0.12: v1(43.835,23.876) 43.835,24.234 43.96,24.359 ; U10.T8@45,15.4 45.022,15.422 45.622,15.422 v1(45.644,15.443)
  L6(SIG) w0.11: v1(43.835,23.876) 43.835,24.506 44.196,24.867 44.425,24.867 44.951,24.34 44.99,24.301 45.244,24.047 cw(c45.166,23.969) 45.244,23.891 44.76,23.407 ccw(c44.811,23.356) 44.76,23.306 44.913,23.153 ccw(c44.964,23.204) 45.015,23.153 45.559,23.697 cw(c45.61,23.646) 45.661,23.697 45.814,23.544 cw(c45.763,23.494) 45.814,23.443 44.882,22.511 ccw(c44.933,22.46) 44.882,22.409 45.034,22.256 ccw(c45.085,22.307) 45.136,22.256 46.068,23.188 cw(c46.119,23.137) 46.17,23.188 46.323,23.035 cw(c46.272,22.984) 46.323,22.934 45.723,22.334 ccw(c45.774,22.283) 45.723,22.232 45.876,22.079 ccw(c45.927,22.13) 45.978,22.079 46.577,22.678 cw(c46.628,22.628) 46.679,22.678 46.831,22.526 cw(c46.781,22.475) 46.831,22.424 46.124,21.716 ccw(c46.175,21.665) 46.124,21.614 46.276,21.461 ccw(c46.327,21.512) 46.378,21.461 46.497,21.581 cw(c46.575,21.503) 46.685,21.503 46.685,21.313 46.685,19.766 46.406,19.486 46.406,19.431 ccw(c46.516,19.431) 46.516,19.321 46.81,19.321 cw(c46.81,19.249) 46.882,19.249 46.882,19.033 cw(c46.81,19.033) 46.81,18.961 44.909,18.961 ccw(c44.909,18.889) 44.837,18.889 44.837,18.673 ccw(c44.909,18.673) 44.909,18.601 46.81,18.601 cw(c46.81,18.529) 46.882,18.529 46.882,18.313 cw(c46.81,18.313) 46.81,18.241 44.909,18.241 ccw(c44.909,18.169) 44.837,18.169 44.837,17.953 ccw(c44.909,17.953) 44.909,17.881 46.81,17.881 cw(c46.81,17.809) 46.882,17.809 46.882,17.593 cw(c46.81,17.593) 46.81,17.521 44.909,17.521 ccw(c44.909,17.449) 44.837,17.449 44.837,17.233 ccw(c44.909,17.233) 44.909,17.161 46.81,17.161 cw(c46.81,17.089) 46.882,17.089 46.882,16.873 cw(c46.81,16.873) 46.81,16.801 46.516,16.801 ccw(c46.516,16.691) 46.406,16.691 46.406,16.218 45.644,15.456 v1(45.644,15.443)
DDR4_BA0: U10.N2 U18.M1 | length 37.3
  L1(SIG) w0.076: U18.M1@42.5,25 42.525,24.975 42.525,24.81 42.579,24.756 42.579,24.359
  L1(SIG) w0.12: 42.579,24.359 42.393,24.172 42.393,20.091 41.808,19.507 35.103,19.507 32.004,16.408 32.004,9.144 32.512,8.636 v1(42.647,8.636) ; U10.N2@42.6,10.6 U10.N2@42.6,10.6 42.987,10.215 v1(42.989,10.215)
  L6(SIG) w0.11: v1(42.647,8.636) 42.989,8.978 v1(42.989,10.215)
DDR4_BA1: U10.N8 U18.N1 | length 37.3
  L1(SIG) w0.076: 42.96,24.359 43,24.399 U18.N1@43,25
  L1(SIG) w0.12: v1(42.215,15.013) 42.215,15.015 U10.N8@42.6,15.4 U10.N8@42.6,15.4 ; v1(42.215,17.196) 42.259,17.24 42.64,17.24 42.849,17.449 42.849,17.58 42.849,17.64 ccw(c42.729,17.64) 42.729,17.76 36.383,17.76 cw(c36.383,17.834) 36.309,17.834 36.309,18.056 cw(c36.383,18.056) 36.383,18.13 42.886,18.13 ccw(c42.886,18.204) 42.96,18.204 42.96,18.426 ccw(c42.886,18.426) 42.886,18.5 36.464,18.5 cw(c36.464,18.574) 36.39,18.574 36.39,18.796 cw(c36.464,18.796) 36.464,18.87 42.729,18.87 ccw(c42.729,18.99) 42.849,18.99 42.849,19.431 42.849,24.248 42.96,24.359
  L6(SIG) w0.11: v1(42.215,15.013) 42.545,15.343 42.545,15.951 42.274,16.222 42.274,16.758 42.231,16.801 42.231,17.18 v1(42.215,17.196)
DDR4_BG0: U10.M2 U18.T4 | length 34.1
  L1(SIG) w0.076: U18.T4@44.5,26.5 44.513,26.487 44.513,26.099 v1(44.526,26.086)
  L1(SIG) w0.12: v1(41.411,10.985) v1(41.411,10.985) 41.798,10.6 U10.M2@41.8,10.6
  L6(SIG) w0.11: v1(41.411,10.985) 41.411,12.252 42.24,13.081 44.348,13.081 44.472,13.081 ccw(c44.472,13.191) 44.55,13.269 44.323,13.495 cw(c44.374,13.546) 44.323,13.597 44.476,13.75 cw(c44.527,13.699) 44.577,13.75 45.311,13.017 ccw(c45.361,13.068) 45.412,13.017 45.565,13.17 ccw(c45.514,13.221) 45.565,13.271 45.446,13.39 cw(c45.497,13.441) 45.446,13.492 45.599,13.645 cw(c45.65,13.594) 45.701,13.645 46.199,13.147 ccw(c46.25,13.198) 46.301,13.147 46.454,13.299 ccw(c46.403,13.35) 46.454,13.401 45.961,13.894 cw(c46.012,13.945) 45.961,13.996 46.114,14.148 cw(c46.165,14.097) 46.216,14.148 46.708,13.656 ccw(c46.759,13.707) 46.81,13.656 46.963,13.808 ccw(c46.912,13.859) 46.963,13.91 46.47,14.403 cw(c46.521,14.454) 46.47,14.505 46.623,14.658 cw(c46.674,14.607) 46.725,14.658 47.217,14.165 ccw(c47.268,14.216) 47.319,14.165 47.472,14.318 ccw(c47.421,14.368) 47.472,14.419 46.979,14.912 cw(c47.03,14.963) 46.979,15.014 47.132,15.167 cw(c47.183,15.116) 47.234,15.167 47.726,14.674 ccw(c47.777,14.725) 47.828,14.674 47.981,14.827 ccw(c47.93,14.878) 47.981,14.929 47.488,15.421 cw(c47.539,15.472) 47.488,15.523 47.641,15.676 cw(c47.692,15.625) 47.743,15.676 47.951,15.468 ccw(c48.029,15.545) 48.107,15.468 48.26,15.621 48.26,21.21 48.26,21.498 ccw(c48.15,21.498) 48.15,21.608 47.601,21.608 cw(c47.601,21.68) 47.529,21.68 47.529,21.896 cw(c47.601,21.896) 47.601,21.968 48.36,21.968 ccw(c48.36,22.04) 48.432,22.04 48.432,22.256 ccw(c48.36,22.256) 48.36,22.328 47.601,22.328 cw(c47.601,22.4) 47.529,22.4 47.529,22.616 cw(c47.601,22.616) 47.601,22.688 47.989,22.688 ccw(c47.989,22.798) 48.066,22.876 47.803,23.139 47.764,23.178 47.646,23.296 cw(c47.724,23.374) 47.646,23.452 47.796,23.601 ccw(c47.745,23.652) 47.796,23.703 47.643,23.856 ccw(c47.592,23.805) 47.541,23.856 47.392,23.706 cw(c47.314,23.784) 47.236,23.706 47.197,23.745 45.263,25.68 45.253,25.68 44.847,26.086 v1(44.526,26.086)
DDR4_CAL0: R145.1 U18.M2 | length 1
  L1(SIG) w0.076: v1(42.28,24.632) 42.251,24.661 42.251,25.251 U18.M2@42.5,25.5
DDR4_CKE: R102.1 U10.K2 U18.H2 | length 35.1
  L1(SIG) w0.076: 40.052,24.359 40.052,24.669 40.249,24.866 40.249,25.249 U18.H2@40.5,25.5
  L1(SIG) w0.12: v1(31.115,21.692) 31.14,21.717 39.014,21.717 40.052,22.755 40.052,24.359 ; v1(39.878,10.236) 39.878,10.257 40.2,10.579 U10.K2@40.2,10.6
  L6(SIG) w0.11: v1(31.115,21.692) 30.81,21.387 30.81,13.97 31.026,13.754 31.065,13.715 31.157,13.623 ccw(c31.235,13.701) 31.313,13.623 31.411,13.721 cw(c31.461,13.67) 31.512,13.721 31.665,13.568 cw(c31.614,13.517) 31.665,13.466 31.169,12.97 ccw(c31.22,12.919) 31.169,12.868 31.322,12.715 ccw(c31.373,12.766) 31.424,12.715 31.92,13.211 cw(c31.971,13.161) 32.021,13.211 32.174,13.059 cw(c32.123,13.008) 32.174,12.957 31.678,12.461 ; 31.678,12.461 ccw(c31.729,12.41) 31.678,12.359 31.831,12.206 ccw(c31.882,12.257) 31.933,12.206 32.176,12.449 cw(c32.253,12.371) 32.331,12.449 32.37,12.41 32.995,11.786 32.995,10.966 34.078,9.883 39.525,9.883 v1(39.878,10.236)
DDR4_CLK_N: R97.2 U10.K8 U18.L2 | length 35.4
  L1(SIG) w0.076: 41.715,24.359 41.754,24.398 41.754,24.689 41.749,24.694 41.749,25.101 41.967,25.319 41.967,25.467 U18.L2@42,25.5
  L1(SIG) w0.11: v1(34.773,20.523) 34.802,20.523 34.957,20.368 35.589,20.368 35.609,20.388 40.462,20.388 40.517,20.388 ccw(c40.517,20.498) 40.627,20.498 40.627,20.544 cw(c40.699,20.544) 40.699,20.616 40.915,20.616 cw(c40.915,20.544) 40.987,20.544 40.987,20.498 ccw(c41.097,20.498) 41.097,20.388 41.453,20.388 41.65,20.388 41.715,20.453 41.715,24.359 ; v1(39.853,15.773) 39.853,15.76 40.2,15.413 U10.K8@40.2,15.4
  L6(SIG) w0.1: v1(34.773,20.523) 34.831,20.523 34.956,20.398 35.222,20.398 35.34,20.28 35.481,20.139 ccw(c35.552,20.209) 35.623,20.139 36.111,20.627 ; 36.112,20.628 cw(c36.373,20.366) 36.582,20.671 36.591,20.671 36.635,20.628 ; 36.635,20.628 36.784,20.479 ; 36.784,20.479 36.827,20.435 36.827,20.426 cw(c36.522,20.217) 36.784,19.956 35.413,18.586 ccw(c35.463,18.536) 35.414,18.487 35.562,18.338 ccw(c35.612,18.388) 35.661,18.338 37.436,20.113 ; 37.437,20.114 cw(c37.698,19.852) 37.907,20.158 37.916,20.158 37.96,20.114 ; 37.96,20.114 38.109,19.966 ; 38.109,19.965 38.152,19.922 38.152,19.913 cw(c37.847,19.704) 38.109,19.442 36.333,17.666 ccw(c36.382,17.617) 36.333,17.568 36.481,17.419 ccw(c36.531,17.469) 36.58,17.419 38.355,19.194 ; 38.356,19.195 cw(c38.618,18.933) 38.826,19.239 38.835,19.239 38.879,19.195 ; 38.879,19.195 39.028,19.046 ; 39.028,19.046 39.072,19.002 39.072,18.993 cw(c38.766,18.785) 39.028,18.523 38.274,17.769 ccw(c38.323,17.72) 38.274,17.67 38.422,17.522 ccw(c38.472,17.571) 38.521,17.522 39.274,18.275 ; 39.275,18.276 cw(c39.537,18.014) 39.798,18.276 39.947,18.127 ; v1(39.853,15.773) 39.848,15.773 39.665,15.957 39.665,16.277 39.665,16.472 39.665,16.619 39.384,16.899 cw(c39.455,16.97) 39.384,17.041 39.947,17.604 ccw(c39.685,17.865) 39.991,18.074 39.991,18.083 39.947,18.127
DDR4_CLK_P: R98.2 U10.K7 U18.L1 | length 35.4
  L1(SIG) w0.076: 41.955,24.359 41.916,24.398 41.916,24.756 41.911,24.761 41.911,24.868 42,24.957 U18.L1@42,25
  L1(SIG) w0.11: v1(34.773,19.973) 34.802,19.973 34.957,20.128 35.688,20.128 35.708,20.148 41.75,20.148 41.955,20.353 41.955,24.359 ; v1(39.853,14.961) 39.853,14.954 40.2,14.607 U10.K7@40.2,14.6
  L6(SIG) w0.1: v1(34.773,19.973) 34.831,19.973 34.956,20.098 35.098,20.098 35.128,20.068 35.269,19.926 ccw(c35.552,20.209) 35.835,19.926 36.324,20.416 cw(c36.373,20.366) 36.423,20.415 ; 35.201,18.798 ccw(c35.463,18.536) 35.201,18.275 35.35,18.126 ccw(c35.612,18.388) 35.873,18.126 37.649,19.902 cw(c37.698,19.852) 37.748,19.902 ; 35.202,18.799 36.571,20.168 ccw(c36.522,20.217) 36.571,20.267 ; 36.121,17.879 ccw(c36.382,17.617) 36.121,17.355 36.269,17.207 ccw(c36.531,17.469) 36.792,17.207 38.568,18.983 cw(c38.618,18.933) 38.667,18.982 38.815,18.835 cw(c38.766,18.785) 38.816,18.735 38.063,17.982 ; 36.121,17.879 37.896,19.654 ccw(c37.847,19.704) 37.896,19.754 37.749,19.901 ; 36.424,20.414 36.571,20.268 ; 38.062,17.981 ccw(c38.323,17.72) 38.062,17.458 38.21,17.31 ccw(c38.472,17.571) 38.734,17.31 39.488,18.064 cw(c39.537,18.014) 39.586,18.063 39.734,17.916 ; 39.734,17.915 cw(c39.685,17.865) 39.735,17.816 39.172,17.253 ccw(c39.455,16.97) 39.172,16.687 39.365,16.494 39.365,16.472 39.365,15.977 39.365,15.716 39.805,15.276 39.805,15.008 v1(39.853,14.961)
DDR4_DQ0: U10.G2 U18.U1 | length 5.6
  L1(SIG) w0.076: 45,24.359 U18.U1@45,25
  L1(SIG) w0.12: v1(37.415,10.213) v1(37.415,10.213) U10.G2@37.8,10.6 U10.G2@37.8,10.602 ; 45,24.359 45,22.861 46.017,21.844 47.473,21.844
DDR4_DQ1: U10.F7 U18.U3 | length 1.1
  L1(SIG) w0.076: v1(36.983,13.945) 36.991,13.953 36.991,14.591 U10.F7@37,14.6 ; U18.U3@45,26 45.005,26.005 45.385,26.005 v1(45.39,26.01)
DDR4_DQ2: U10.H3 U18.U2 | length 5.7
  L1(SIG) w0.076: U18.U2@45,25.5 45.251,25.249 45.251,24.437 45.314,24.374 45.314,24.359
  L1(SIG) w0.12: v1(38.213,11.785) v1(38.213,11.785) U10.H3@38.6,11.4 U10.H3@38.602,11.4 ; 45.314,24.359 45.314,23.055 46.255,22.114 47.498,22.114
DDR4_DQ3: U10.H7 U18.V5 | length 1.1
  L1(SIG) w0.076: v1(38.583,13.945) 38.591,13.953 38.591,14.591 U10.H7@38.6,14.6 ; v1(45.161,27.254) 45.203,27.254 45.458,27 U18.V5@45.5,27
DDR4_DQ4: U10.H2 U18.W2 | length 3
  L1(SIG) w0.076: U18.W2@46,25.5 46.251,25.249 46.251,24.52 46.354,24.417 46.354,24.359
  L1(SIG) w0.12: 46.354,24.359 46.354,23.724 46.923,23.154 47.219,23.154
DDR4_DQ5: U10.H8 U18.V6 | length 1
  L1(SIG) w0.076: U18.V6@45.5,27.5 45.53,27.53 45.894,27.53 v1(45.923,27.559)
  L1(SIG) w0.12: v1(38.215,15.013) 38.215,15.015 U10.H8@38.6,15.4 U10.H8@38.6,15.4
DDR4_DQ6: U10.J3 U18.Y1 | length 0.5
  L1(SIG) w0.12: v1(39.013,11.785) 39.015,11.785 U10.J3@39.4,11.4 U10.J3@39.4,11.4
DDR4_DQ7: U10.J7 U18.W1 | length 3.8
  L1(SIG) w0.076: v1(39.383,13.945) 39.391,13.953 39.391,14.591 U10.J7@39.4,14.6 ; U18.W1@46,25 46,24.538 46.084,24.455 46.084,24.359
  L1(SIG) w0.12: 46.084,24.359 46.084,23.487 46.687,22.884 47.396,22.884
DDR4_DQ8: U10.A3 U18.F4 | length 1
  L1(SIG) w0.076: v1(39.014,26.492) 39.018,26.496 39.496,26.496 U18.F4@39.5,26.5
  L1(SIG) w0.12: v1(32.615,11.013) v1(32.615,11.013) U10.A3@33,11.4 U10.A3@33,11.402
DDR4_DQ9: U10.B8 U18.G5 | length 1.1
  L1(SIG) w0.076: v1(39.472,27) U18.G5@40,27
  L1(SIG) w0.12: v1(33.415,15.013) 33.415,15.015 U10.B8@33.8,15.4 U10.B8@33.8,15.4
DDR4_DQ10: U10.C3 U18.F3 | length 1.1
  L1(SIG) w0.076: U18.F3@39.5,26 39.518,26.017 40.013,26.017 v1(40.03,26.035)
  L1(SIG) w0.12: v1(34.215,11.013) v1(34.215,11.013) U10.C3@34.6,11.4 U10.C3@34.6,11.402
DDR4_DQ11: U10.C7 U18.H6 | length 1.1
  L1(SIG) w0.076: v1(34.592,14.036) 34.596,14.04 34.596,14.596 U10.C7@34.6,14.6 ; U18.H6@40.5,27.5 40.517,27.517 40.953,27.517 v1(40.97,27.534)
DDR4_DQ12: U10.C2 U18.E3 | length 1
  L1(SIG) w0.076: v1(38.532,25.984) 38.54,25.992 38.992,25.992 U18.E3@39,26
  L1(SIG) w0.12: v1(34.215,10.213) v1(34.215,10.213) U10.C2@34.6,10.6 U10.C2@34.6,10.602
DDR4_DQ13: U10.C8 U18.G2 | length 0.5
  L1(SIG) w0.12: v1(34.215,15.013) 34.215,15.015 U10.C8@34.6,15.4 U10.C8@34.6,15.4
DDR4_DQ14: U10.D3 U18.F2 | length 0.5
  L1(SIG) w0.12: v1(35.015,11.013) v1(35.015,11.013) U10.D3@35.4,11.4 U10.D3@35.4,11.402
DDR4_DQ15: U10.D7 U18.F1 | length 0.6
  L1(SIG) w0.076: v1(35.392,14.036) 35.396,14.04 35.396,14.596 U10.D7@35.4,14.6